# Altium PCB PCB.PcbDoc (part 1 of 2)
Units mil, origin at the board's own origin, x right, y up, seen from the top; angles counter-clockwise.
Board outline 3937.01 x 3937.01 mil, 4 copper layers (Top Layer, GND, POWER, Bottom Layer), stack 61.066 mil thick; 102 components, 56 nets, 281 pads, 1348 vias.
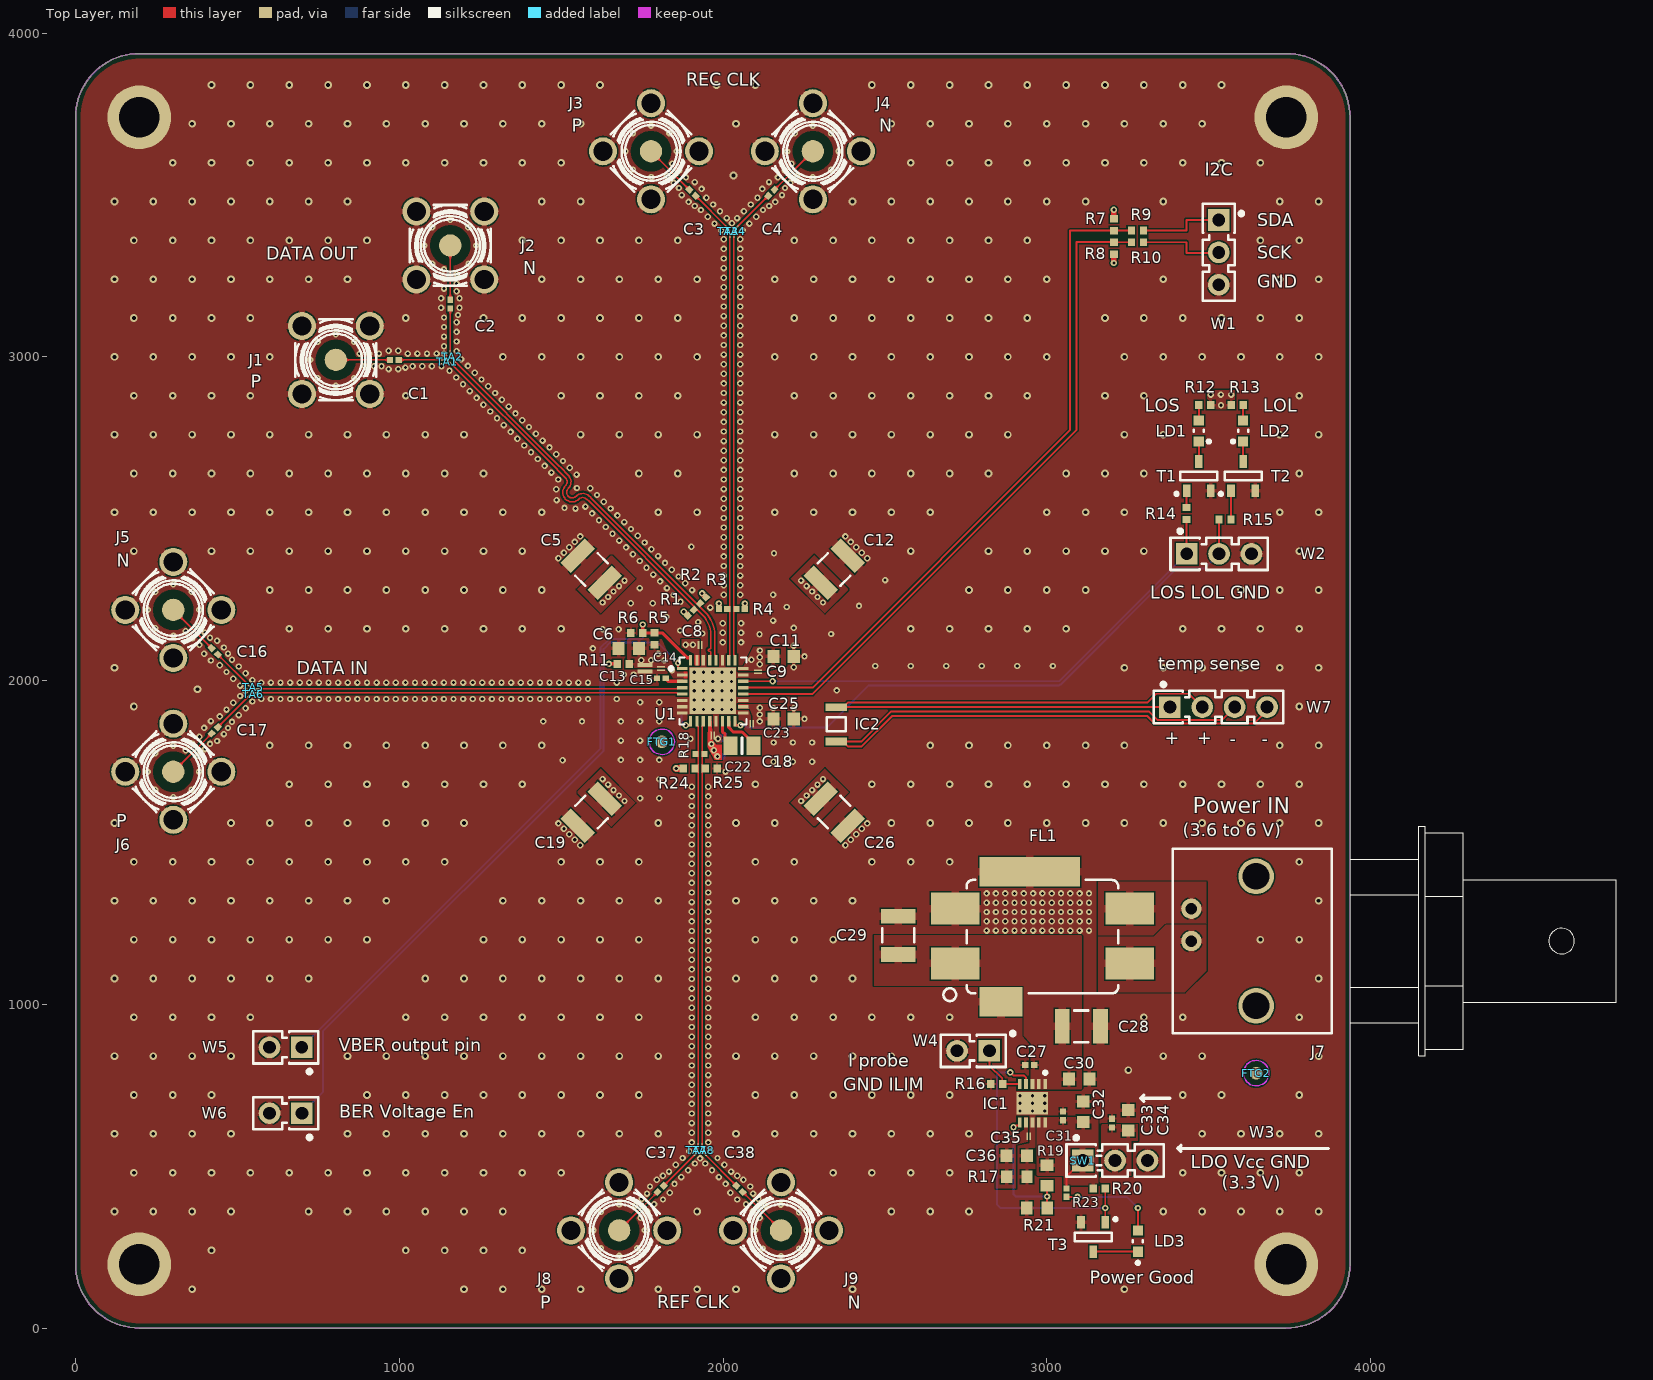
[diagram p0: Top Layer view]
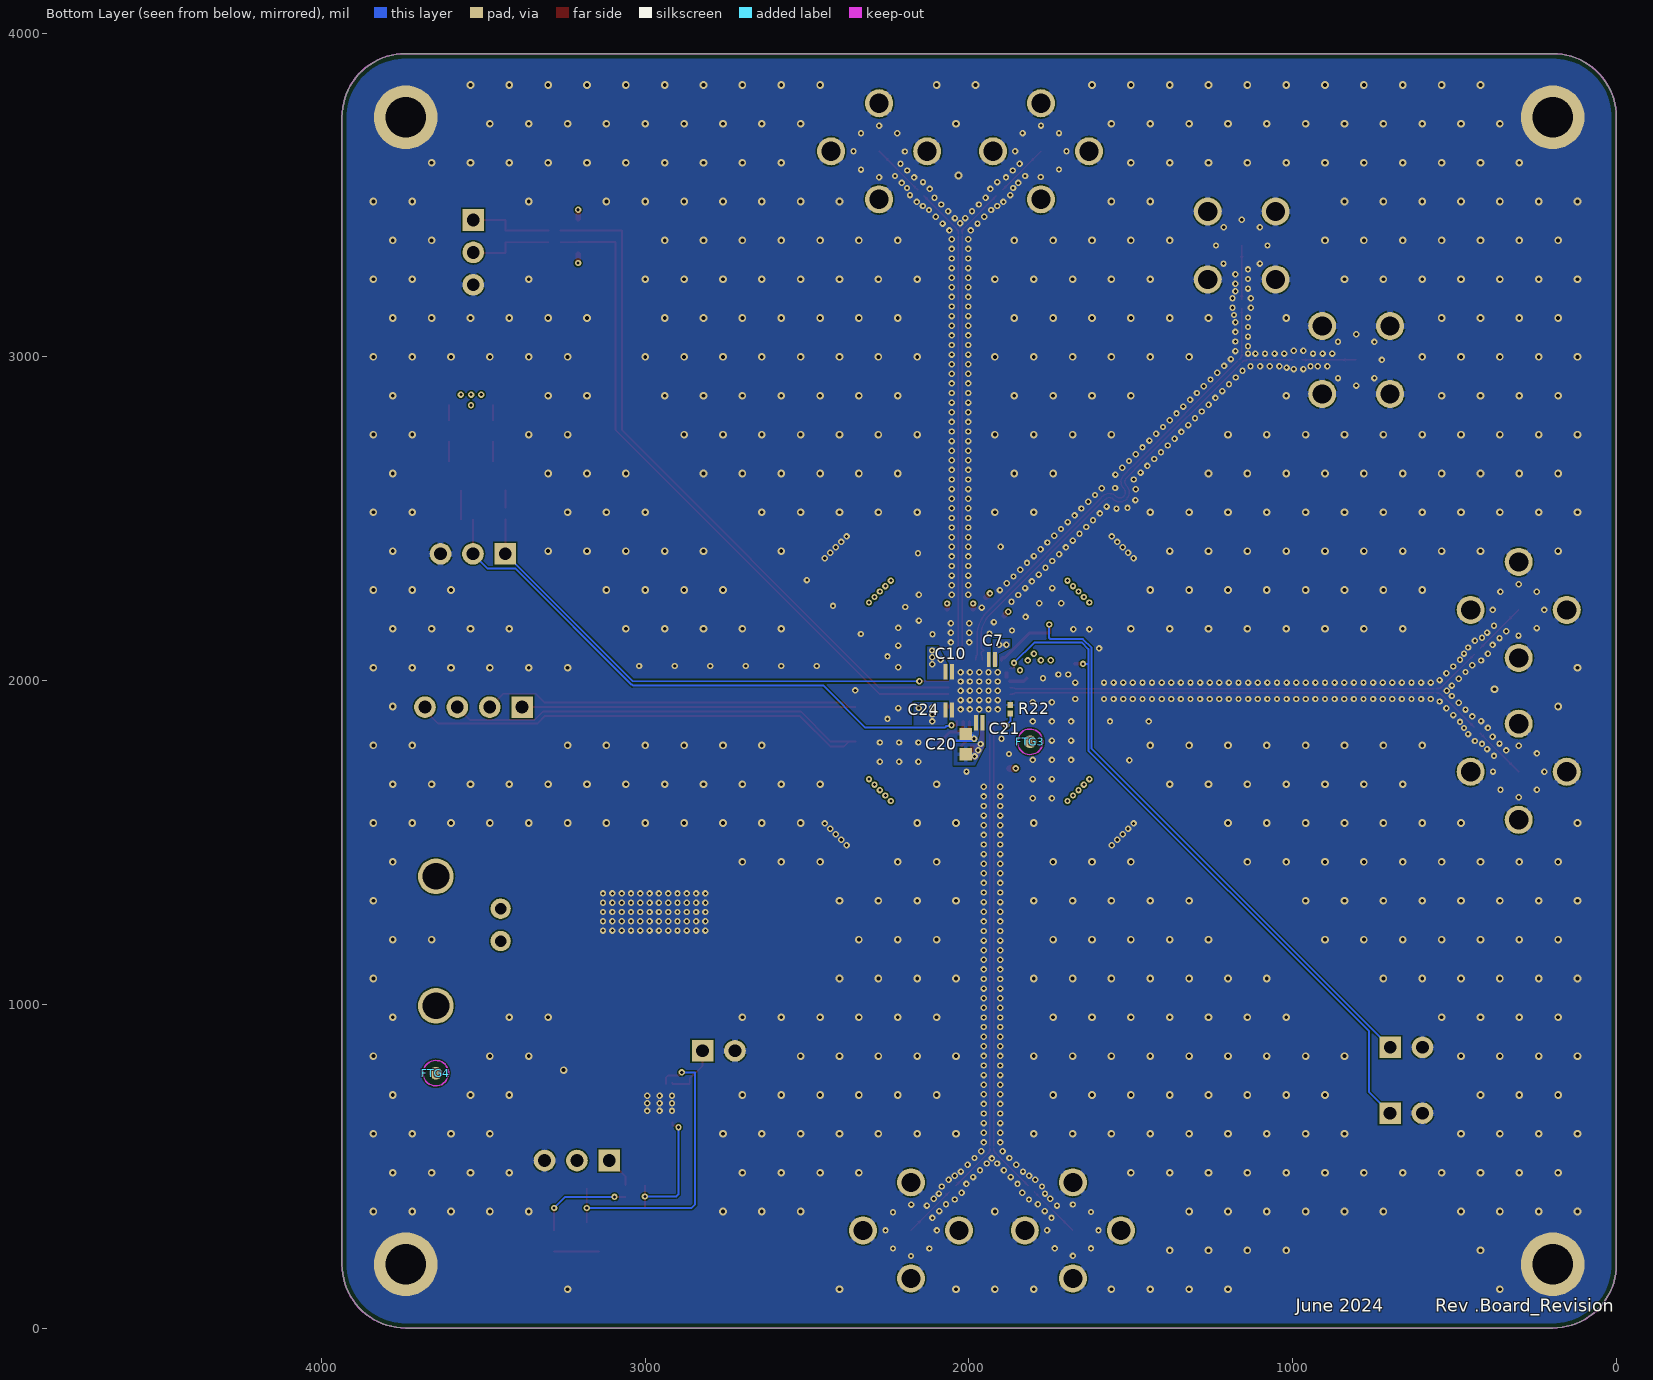
[diagram p1: Bottom Layer view, seen from below]
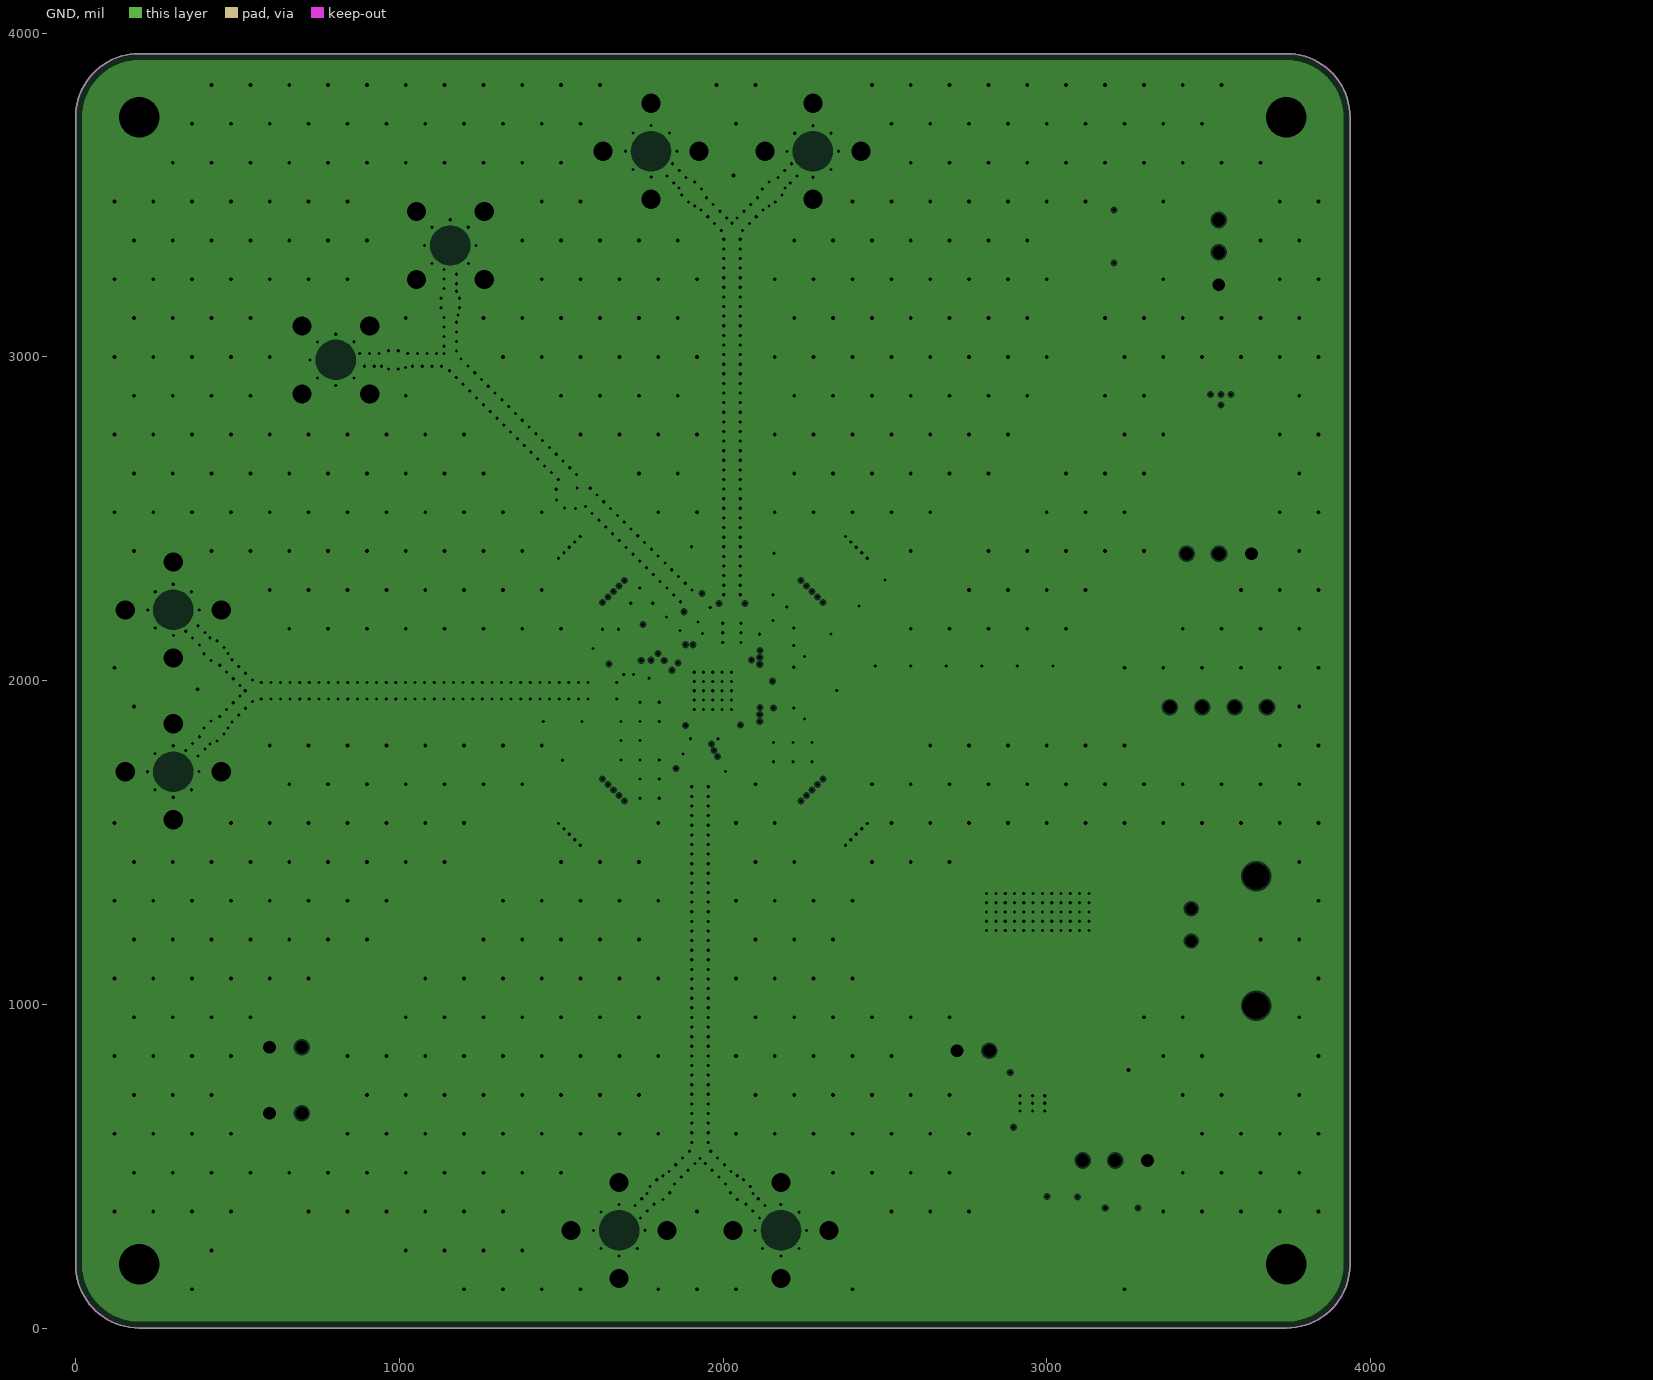
[diagram p2: GND, clearances drawn from the general rule]
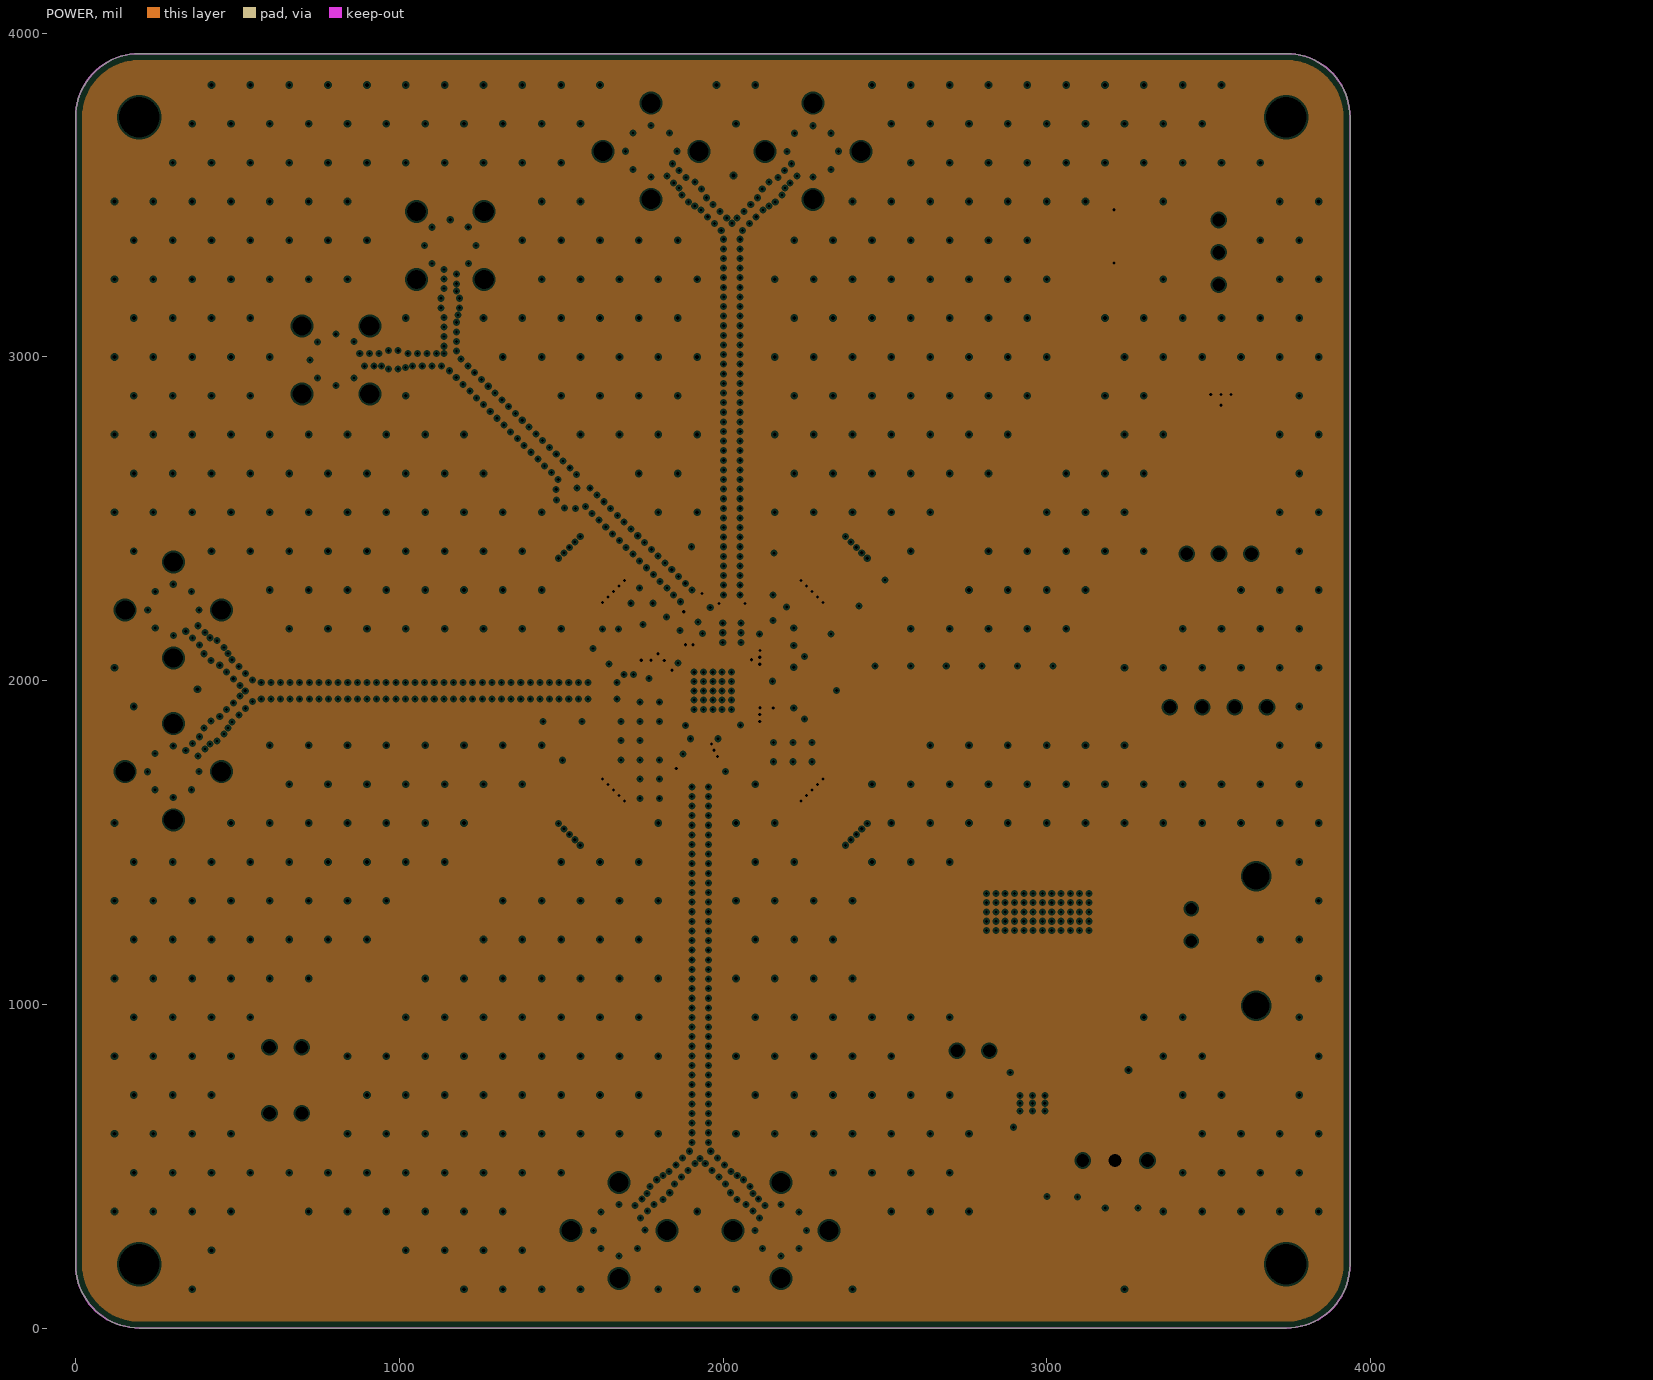
[diagram p3: POWER, clearances drawn from the general rule]
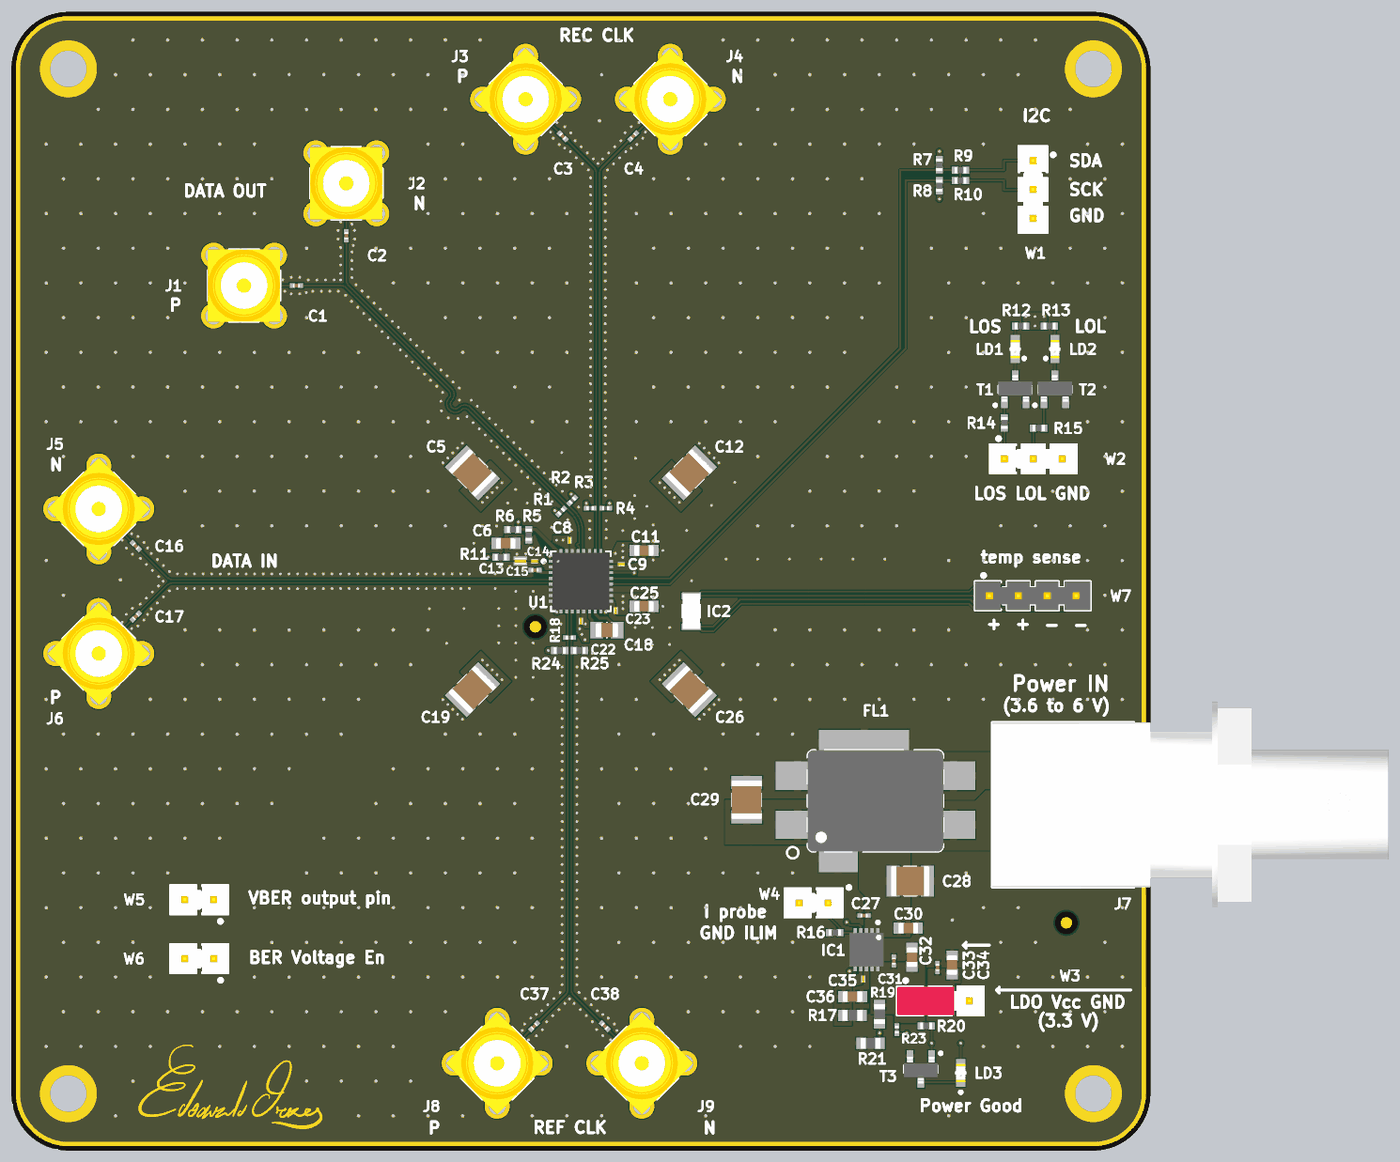
[diagram p5: 3D render of the assembled board from above, using the file's embedded part models]
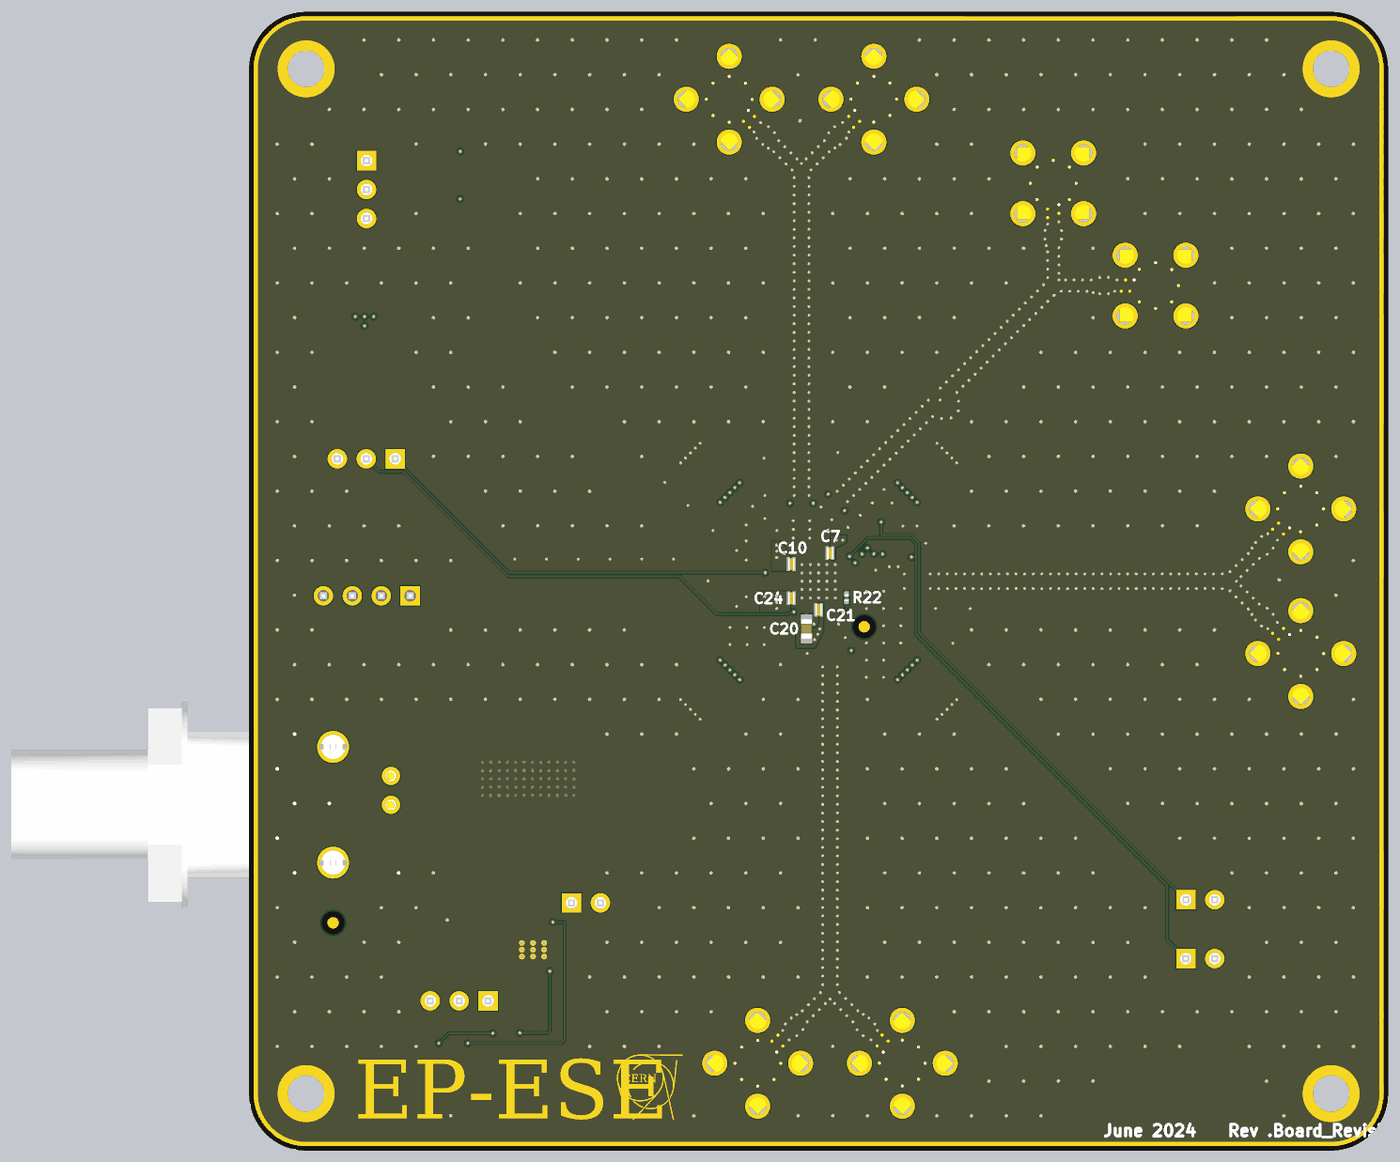
[diagram p6: 3D render of the assembled board from below, using the file's embedded part models]

## Layer stack, top to bottom
Top Solder: solder mask 1.969, Solder Resist, Dk 4.6
Top Layer: signal copper 1.772
Core_Top: core 3.937, R-5775G_1035, Dk 3.46
GND: plane copper 0.689, net GND
PrePreg_Top: prepreg 9.371, R-5670G, Dk 3.4
Core: core 29.528, R-5775G_2116, Dk 3.71
PrePreg_Bot: prepreg 9.371, R-5670G, Dk 3.4
POWER: plane copper 0.689, net Vcc
Core_Bottom: core 3.937, R-5775G_1035, Dk 3.46
Bottom Layer: signal copper 1.772
Bottom Solder: solder mask 1.969, Solder Resist, Dk 4.6

## Board outline
3937.01,3740.01 ccw(c3740.01,3740.01) 3740.01,3937.01 197,3937.01 ccw(c197,3740.01) 0,3740.01 0,197 ccw(c197,197) 197,0 3740.01,0 ccw(c3740.01,197) 3937.01,197 3937.01,787.4

## Design rules (kind name [scope] priority, off if disabled: settings)
BoardOutlineClearance BoardOutlineClearance_Silk_PWR_Connector [InComponentClass('PWR_Connector')] p1: gap=0 ignorepadtopadclearanceinfootprint=FALSE
BoardOutlineClearance [All] p2: gap=15 ignorepadtopadclearanceinfootprint=FALSE
Clearance Clearance_SMA_pad [HasFootprint('SAMTEC_SMA-J-P-H-ST-MT1') and InNetClass('50ohm')] p1: gap=4 ignorepadtopadclearanceinfootprint=FALSE except(27.6: SMDPad-Fill SMDPad-Poly SMDPad-Region)
Clearance Clearance_Coplanar [InAnyDifferentialPair or InNetClass('50ohm') or HasFootprint('lane_width_transition')] p2: gap=4 ignorepadtopadclearanceinfootprint=FALSE except(6: Arc-Fill Arc-Poly Arc-Region Track-Fill Track-Poly Track-Region Fill-Fill Fill-Poly Fill-Region Poly-Poly Poly-Region Region-Region)
Clearance [All] p3: gap=4 ignorepadtopadclearanceinfootprint=FALSE
ComponentClearance [All] p1: gap=-20 collisioncheckmode=3 verticalgap=0 showdistances=FALSE
DiffPairsRouting [InDifferentialPairClass('All Differential Pairs')] p1: maxlimit=8.23 minlimit=8.23 mostfreqgap=8.23 toplayer_minwidth=4 toplayer_maxwidth=5.18 toplayer_prefwidth=4 bottomlayer_minwidth=4 bottomlayer_maxwidth=5.18 bottomlayer_prefwidth=4 impedanceprofiledriven=TRUE impedanceprofileid={FCCFDEF1-A1CC-456B-AB0B-FF4024286867} impedanceprofilevalue=100.000000 maxuncoupledlength=200
HoleSize [All] p1: absolutevalues=TRUE maxlimit=255.91 minlimit=9.84 maxpercent=80.000 minpercent=20.000
HoleToHoleClearance [Isvia] p1: gap=11 allowstackedmicrovias=TRUE
HoleToHoleClearance HoleToHoleClearance_Standard [All] p2: gap=16 allowstackedmicrovias=TRUE
MatchedLengths MatchedLengths_Output_Lanes [InNetClass('Output_Lanes')] p1: tolerance=10 checknetsindiffpair=FALSE checkdiffpairvsdiffpair=TRUE checkxsignals=TRUE checkothers=TRUE
MatchedLengths MatchedLengths_Inside [InDifferentialPairClass('All Differential Pairs')] p2: tolerance=1 checknetsindiffpair=TRUE checkdiffpairvsdiffpair=FALSE checkxsignals=FALSE checkothers=FALSE
MinimumAnnularRing [not IsVia] p1: minimumring=6
MinimumSolderMaskSliver [All] p1: minsoldermaskwidth=2
PlaneClearance [All] p1: clearance=6
PlaneConnect PlaneConnect_Frame_Hole [InPadClass('Frame_Holes')] p1: planeconnectstyle=Direct reliefexpansion=20 reliefentries=4 reliefconductorwidth=10 reliefairgap=10
PlaneConnect PlaneConnect_PWR [InComponentClass('PWR_Jumper')] p2: planeconnectstyle=Relief reliefexpansion=20 reliefentries=4 reliefconductorwidth=25 reliefairgap=7
PlaneConnect [All] p3: pad.planeconnectstyle=Relief pad.reliefexpansion=20 pad.reliefentries=4 pad.reliefconductorwidth=12 pad.reliefairgap=7 via.planeconnectstyle=Direct via.reliefexpansion=20 via.reliefentries=4 via.reliefconductorwidth=10 via.reliefairgap=10
PolygonConnect PolygonConnect_Frame_Hole [InPadClass('Frame_Holes')] p1: connectstyle=Direct reliefconductorwidth=10 reliefentries=4 polygonreliefangle="90 Angle" airgapwidth=10
PolygonConnect PolygonConnect_Direct [(HasFootprint('CP_32_11_ADI') OR HasFootprint('LLL03TR61E333KE01') OR HasFootprint('SON50P300X300X80-11N-R175X248') OR HasFootprint('CAPC0510X04N'))] p2: connectstyle=Direct reliefconductorwidth=10 reliefentries=4 polygonreliefangle="90 Angle" airgapwidth=10 // LDO, CDR, some small capacitor
PolygonConnect PolygonConnect_Large [AsMM(PadXSize_AllLayers + PadYSize_AllLayers) > 2.5] p3: thpad.connectstyle=Relief thpad.reliefconductorwidth=20 thpad.reliefentries=4 thpad.polygonreliefangle="90 Angle" thpad.airgapwidth=4 smdpad.connectstyle=Relief smdpad.reliefconductorwidth=25 smdpad.reliefentries=4 smdpad.polygonreliefangle="90 Angle" smdpad.airgapwidth=4 via.connectstyle=Direct via.reliefconductorwidth=10 via.reliefentries=4 via.polygonreliefangle="90 Angle" via.airgapwidth=10
PolygonConnect "PolygonConnect_ Mid" [AsMM(PadXSize_AllLayers + PadYSize_AllLayers) > 1.5] p4: thpad.connectstyle=Relief thpad.reliefconductorwidth=12 thpad.reliefentries=4 thpad.polygonreliefangle="90 Angle" thpad.airgapwidth=4 smdpad.connectstyle=Relief smdpad.reliefconductorwidth=12 smdpad.reliefentries=4 smdpad.polygonreliefangle="90 Angle" smdpad.airgapwidth=4 via.connectstyle=Direct via.reliefconductorwidth=12 via.reliefentries=4 via.polygonreliefangle="90 Angle" via.airgapwidth=5
PolygonConnect [All] p5: thpad.connectstyle=Relief thpad.reliefconductorwidth=10 thpad.reliefentries=4 thpad.polygonreliefangle="90 Angle" thpad.airgapwidth=4 smdpad.connectstyle=Relief smdpad.reliefconductorwidth=8 smdpad.reliefentries=4 smdpad.polygonreliefangle="90 Angle" smdpad.airgapwidth=4 via.connectstyle=Direct via.reliefconductorwidth=10 via.reliefentries=4 via.polygonreliefangle="90 Angle" via.airgapwidth=10
RoutingVias [All] p1: holewidth=9.84 width=19.68 viastyle="Through Hole" minholewidth=9.84 minwidth=19.68 maxholewidth=11.81 maxwidth=23.62
SilkToSilkClearance [All] p1: silktosilkclearance=0
SilkToSolderMaskClearance [IsPad] p1: minsilkscreentomaskgap=3.5 clearancetoexposedcopper=TRUE
SolderMaskExpansion SolderMaskExpansion_Via [IsVia] p1: expansion=4 istentingtop=TRUE
SolderMaskExpansion [All] p2: expansion=0 istentingtop=FALSE
Width Width_lane_width_transition_arcs [HasFootprint('lane_width_transition')] p1: maxlimit=10 minlimit=1 preferedwidth=10 minimp=50.000000 maximp=50.000000 favimp=50.000000
Width Width_50ohm [InNetClass('50ohm')] p2: maxlimit=5.18 minlimit=5.18 preferedwidth=5.18 impedanceprofiledriven=TRUE impedanceprofileid={2039E037-1DE5-4FE9-8E1A-1FC9DE3EC960} impedanceprofilevalue=50.000000 minimp=50.000000 maximp=50.000000 favimp=50.000000
Width [All] p3: maxlimit=100 minlimit=5 preferedwidth=6 minimp=50.000000 maximp=50.000000 favimp=50.000000
21 further rules are at their usual default settings.

## Classes and differential pairs
net class 50ohm: NetC1_1 NetC1_2 NetC2_1 NetC2_2 NetC3_1 NetC3_2 NetC4_1 NetC4_2 NetC16_1 NetC16_2 NetC17_1 NetC17_2 NetC37_1 NetC37_2 NetC38_1 NetC38_2
component class PWR_Connector: J7
pad class Frame_Holes: Free-Frame_Holes
component class PWR_Jumper: W3
net class Output_Lanes: CLK_OUT_N CLK_OUT_P DATA_OUT_N DATA_OUT_P
net class Power: GND LDO_out NetFL1_1 NetFL1_3 Pmain Vcc
differential pair DATA_OUT: +DATA_OUT_P -DATA_OUT_N
differential pair DATA_IN: +DATA_IN_P -DATA_IN_N
differential pair CLK_OUT: +CLK_OUT_P -CLK_OUT_N
differential pair CLK_IN: +CLK_IN_P -CLK_IN_N

## Components (designator, comment, footprint, x,y, rotation, side; value= is the part's Value field where it differs from the comment)
C1 "100nF" CAPC0603X33N 985.08,2990.78 r180 top
C2 "100nF" CAPC0603X33N 1157.48,3163.18 r90 top
C3 "100nF" CAPC0603X33N 1905.65,3507.14 r135 top
C4 "100nF" CAPC0603X33N 2149.47,3507.14 r45 top
C5 "100uF" CAPC3225X270N 1593.58,2343.43 r315 top
C6 "10uF" CAPC1608X87N 1708.84,2099.58 r0 top
C7 "470nF" CAPC0510X04N 1929.13,2065.57 r180 bottom
C8 "33nF" LLL03TR61E333KE01 1929.13,2110.27 r180 top
C9 "33nF" LLL03TR61E333KE01 2107.99,2027.56 r90 top
C10 "470nF" CAPC0510X04N 2062.75,2027.77 r0 bottom
C11 "10uF" CAPC1608X87N 2186.92,2074.82 r180 top
C12 "100uF" CAPC3225X270N 2343.43,2343.43 r225 top
C13 "470nF" CAPC0510X04N 1759.13,2038.48 r90 top
C14 "33nF" LLL03TR61E333KE01 1808.39,2037.48 r90 top
C15 "100nF" CAPC0603X33N 1809.74,2007.16 r0 top
C16 "100nF" CAPC0603X33N 429.86,2090.41 r315 top locked
C17 "100nF" CAPC0603X33N 429.86,1846.6 r45 top locked
C18 "470nF" CAPC2013X140N 2058.61,1799.37 r0 top
C19 "100uF" CAPC3225X270N 1593.58,1593.58 r45 top
C20 "10uF" CAPC1608X87N 2010.37,1804.11 r270 bottom
C21 "470nF" CAPC0510X04N 1968.5,1870 r180 bottom
C22 "33nF" LLL03TR61E333KE01 1968.5,1830.36 r180 top
C23 "33nF" LLL03TR61E333KE01 2088.93,1866.93 r0 top
C24 "470nF" CAPC0510X04N 2062.75,1909.49 r0 bottom
C25 "10uF" CAPC1608X87N 2186.92,1881.74 r180 top
C26 "100uF" CAPC3225X270N 2343.43,1593.58 r135 top
C27 "220nF" CAPC0603X33N 2947.46,812.36 r0 top
C28 "100uF" CAPC3225X270N 3107.01,931.8 r180 top
C29 "100uF" CAPC3225X270N 2541.49,1212.93 r270 top
C30 "10uF" CAPC1608X87N 3100.31,769.1 r180 top
C31 "220nF" CAPC0603X33N 3050.21,655.15 r270 top
C32 "10uF" CAPC1608X87N 3113.16,668.52 r270 top
C33 "220nF" CAPC0603X33N 3201.35,633.17 r270 top
C34 "10uF" CAPC1608X87N 3251.74,641.63 r270 top
C35 "33nF" LLL03TR61E333KE01 2944.52,592.6 r180 top
C36 "10uF" CAPC1608X87N 2907.52,532.1 r180 top
C37 "100nF" CAPC0603X33N 1807.23,429.86 r45 top locked
C38 "100nF" CAPC0603X33N 2051.04,429.86 r135 top locked
FL1 "BNX029-01L" FIL_MURATA_BNX02 2986.69,1209.11 r180 top locked
FTG1 "Use only in PCB" FIDUCIAL_TOP_C100-200 1811.02,1811.02 r90 top
FTG2 "Use only in PCB" FIDUCIAL_TOP_C100-200 3646.85,787.4 r90 top
FTG3 "Use only in PCB" FIDUCIAL_TOP_C100-200 1811.02,1811.02 r90 bottom
FTG4 "Use only in PCB" FIDUCIAL_TOP_C100-200 3646.85,787.4 r90 bottom
IC1 "LT3045EDD" SON50P300X300X80-11N-R175X248 2955.8,694.39 r270 top
IC2 "PT1000 SMD 1206 fd F 0,3" DFN310X150X55-2N 2350,1865 r270 top
J1 "SMA" SAMTEC_SMA-J-P-H-ST-MT1#1 803.93,2990.78 r90 top
J2 "SMA" SAMTEC_SMA-J-P-H-ST-MT1#1 1157.48,3344.33 r90 top
J3 "SMA" SAMTEC_SMA-J-P-H-ST-MT1#1 1777.56,3635.24 r45 top locked
J4 "SMA" SAMTEC_SMA-J-P-H-ST-MT1#2 2277.56,3635.24 r315 top locked
J5 "SMA" SAMTEC_SMA-J-P-H-ST-MT1#2 301.77,2218.5 r315 top locked
J6 "SMA" SAMTEC_SMA-J-P-H-ST-MT1#2 301.77,1718.5 r45 top locked
J7 "BNC" AMPHENOL_B6252H7-NPP3G-50 3646.85,1195.5 r90 top locked
J8 "SMA" SAMTEC_SMA-J-P-H-ST-MT1#1 1679.13,301.77 r135 top locked
J9 "SMA" SAMTEC_SMA-J-P-H-ST-MT1#1 2179.13,301.77 r225 top locked
LD1 "APTD1608LSURCK" LED_KINGBRIGHT_KP-1608SURCK 3469.73,2771.29 r90 top locked
LD2 "APTD1608LSURCK" LED_KINGBRIGHT_KP-1608SURCK 3606.74,2771.29 r90 top locked
LD3 "APT1608VRCXF/A-5MAV" LED_KINGBRIGHT_KP-1608QBC-D 3281.53,268.41 r90 top
R1 "100" RESC0603X28N#1 1900.55,2209.58 r225 top
R2 "100" RESC0603X28N#1 1938.67,2247.71 r45 top
R3 "100" RESC0603X28N#1 2000.61,2221.28 r180 top
R4 "100" RESC0603X28N#1 2054.51,2221.29 r0 top
R5 "10k" RESC1005X40N 1787.86,2129.01 r270 top
R6 "3k" RESC1005X40N 1733.68,2146.93 r0 top
R7 "1k" RESC1005X40N 3207.56,3408.41 r90 top
R8 "1k" RESC1005X40N 3207.56,3336.12 r270 top
R9 "22" RESC1005X40N 3280.33,3389.94 r0 top
R10 "22" RESC1005X40N 3280.33,3354.26 r0 top
R11 "10k" RESC1005X40N 1691.8,2051.83 r0 top
R12 "787" RESC1005X40N 3488.23,2850.94 r0 top
R13 "787" RESC1005X40N 3588.23,2850.94 r180 top
R14 "200k" RESC1005X40N 3432.33,2516.21 r90 top
R15 "200k" RESC1005X40N 3550.83,2497.7 r0 top
R16 "300" RESC1005X40N 2846.13,753.44 r0 top
R17 "33k" RESC1608X55N 2907.52,467.61 r180 top
R18 "100" RESC0603X28N#2 1929.13,1773.39 r0 top
R19 "750k" RESC1608X55N 3001.19,471.52 r90 top
R20 "200k" RESC1005X40N 3162.21,431.09 r180 top
R21 "78k7" RESC1608X55N 2969.69,370.99 r0 top
R22 "100" RESC0603X28N#1 1872.33,1911.58 r270 bottom
R23 "100" RESC0603X28N#1 3060.74,418.1 r90 top
R24 "1M" RESC1005X40N 1895.09,1728.94 r180 top
R25 "1M" RESC1005X40N 1963.18,1728.94 r180 top
SW1 "Jumper Type1" STELVIO-KONTEK_3131730000402 3111.12,517.47 r0 top
T1 "BSH103" SOT95P230X110-3N 3469.73,2631.97 r90 top locked
T2 "BSH103" SOT95P230X110-3N 3606.74,2631.97 r90 top locked
T3 "BSH103" SOT95P230X110-3N 3143.31,281.21 r270 top
TA1 "Differential to Single Transition" lane_width_transition#1 1157.48,2990.78 r225 top net-tie
TA2 "Differential to Single Transition" lane_width_transition#2 1157.48,2990.78 r45 top net-tie
TA3 "Differential to Single Transition" lane_width_transition#1 2027.56,3385.24 r180 top net-tie
TA4 "Differential to Single Transition" lane_width_transition#2 2027.56,3385.24 r0 top net-tie
TA5 "Differential to Single Transition" lane_width_transition#2 551.77,1968.5 r90 top net-tie
TA6 "Differential to Single Transition" lane_width_transition#1 551.77,1968.5 r270 top net-tie
TA7 "Differential to Single Transition" lane_width_transition#2 1929.13,551.77 r180 top net-tie
TA8 "Differential to Single Transition" lane_width_transition#1 1929.13,551.77 r0 top net-tie
U1 "ADN2817ACPZ-RL7" CP_32_11_ADI 1968.5,1968.5 r0 top locked
W1 "Header 3" SAMTEC_HTSW-103-23-L-S 3531.36,3422.87 r270 top
W2 "Header 3" SAMTEC_HTSW-103-23-L-S 3432.33,2391.73 r0 top locked
W3 "Header 3" SAMTEC_HTSW-103-23-L-S 3111.12,517.47 r0 top
W4 "Header 2" SAMTEC_HTSW-102-23-L-S 2822.9,856.5 r180 top
W5 "Header 2" SAMTEC_HTSW-102-23-L-S 699,867.24 r180 top
W6 "Header 2" SAMTEC_HTSW-102-23-L-S 699.09,663.62 r180 top
W7 "Header 4" SAMTEC_HTSW-104-23-L-S 3380.51,1918.15 r0 top

## Footprints (in the part's own frame and the unit in brackets; to place one, negate y for a bottom-side part, rotate by r counter-clockwise, add the part's x,y. Pads: shape width x height; smd on the part's side, far side on the other; paste and mask are expansions set on the pad)
AMPHENOL_B6252H7-NPP3G-50 [mm] "RF / Coaxial Connector, BNC Coaxial, Right Angle Jack, Through Hole Right Angle, 50 ohm"
  round 1.6 hole 0.9: 1(0,5.08) 2(2.54,5.08)
  round 2.8 hole 2.1: MECH(-5.08,0) MECH_1(5.08,0)
  silkscreen extent -9,-28.27 9,6.53, body extent -9,-28.27 9,6.53, height 15.9
CAPC0510X04N [mm] "Chip Capacitor, 2-Leads, Body 0.52x1.00mm, IPC Medium Density"
  rect 0.3x1.2 smd: 1(-0.25,0) 2(0.25,0)
  body extent -0.29,-0.53 0.29,0.53, height 0.35
CAPC0603X33N [mm] "Chip Capacitor, Body 0.6x0.30mm, IPC Medium Density"
  rect 0.5x0.45 smd paste-0.025 mask-0.025: 1(-0.35,0) 2(0.35,0)
  body extent -0.31,-0.16 0.32,0.17, height 0.33
CAPC1608X87N [mm] "Chip Capacitor, Body 1.6x0.8mm IPC Medium Density"
  rect 0.95x1 smd: 1(-0.8,0) 2(0.8,0)
  body extent -0.87,-0.47 0.88,0.48, height 0.87
CAPC2013X140N [mm] "Capacitor, Non-Polarized, Chip; 2.00mm L X 1.25mm W X 1.40mm H, IPC Medium Density"
  rect 1.1x1.45 smd: 1(-0.9,0) 2(0.9,0)
  silkscreen extent 0,-0.63 0,0.63, body extent -1,-0.62 1.01,0.63, height 1.4
CAPC3225X270N [mm] "Chip Capacitor, Body 3.2x2.5mm, IPC Medium Density"
  rect 1.15x2.7 smd: 1(-1.5,0) 2(1.5,0)
  silkscreen extent -0.55,-1.25 0.55,1.25, body extent -1.7,-1.35 1.7,1.35, height 2.7
CP_32_11_ADI [mil]
  rect 32x10 smd paste+0 mask+0: 1(-94.5,68.9) 2(-94.5,49.21) 3(-94.5,29.53) 4(-94.5,9.84) 5(-94.5,-9.84) 6(-94.5,-29.53) 7(-94.5,-49.21) 8(-94.5,-68.9) 17(94.5,-68.9) 18(94.5,-49.21) 19(94.5,-29.53) 20(94.5,-9.84) 21(94.5,9.84) 22(94.5,29.53) 23(94.5,49.21) 24(94.5,68.9)
  rect 10x32 smd paste+0 mask+0: 9(-68.9,-94.5) 10(-49.21,-94.5) 11(-29.53,-94.5) 12(-9.84,-94.5) 13(9.84,-94.5) 14(29.53,-94.5) 15(49.21,-94.5) 16(68.9,-94.5) 25(68.9,94.5) 26(49.21,94.5) 27(29.53,94.5) 28(9.84,94.5) 29(-9.84,94.5) 30(-29.53,94.5) 31(-49.21,94.5) 32(-68.9,94.5)
  rect 144x144 smd paste-72 mask+0: 33(0,0)
  silkscreen extent -134,-104 104,104, body extent -99,-99 99,99, height 39
DFN310X150X55-2N [mm] "DFN; 2 Pin,3.10mm L X 1.50mm W X 0.40mm H, IPC Medium Density"
  rect 0.6x1.7 smd: 1(-1.35,0) 2(1.35,0)
  silkscreen extent -0.55,-0.75 0.55,0.75, body extent -1.55,-0.75 1.55,0.75, height 0.55
FIDUCIAL_TOP_C100-200 [mm] "Round Fiducial Target, Top Layer, 1.0mm, Top Solder 2.0mm, Keepout =2.0mm"
  round 1 smd paste-0.51 mask+0.5: FTG2(0,0)
  Top Layer keep-out circle w0.1: c0,0 r1
FIL_MURATA_BNX02 [mm] "Block Type EMIFIL LC Combined Type, BNX02* Series"
  rect 3.8x2.5 smd: 1(-6.85,2.1) 2(6.85,2.1) 3(-6.85,-2.2) 4_2(6.85,-2.2)
  rect 7.9x2.3 smd: 4(1,-5.1)
  rect 3.4x2.3 smd: 4_1(3.25,5.1)
  silkscreen extent -5.95,-4.45 7.77,5.05, body extent -6.05,-4.55 6.05,4.55, height 3.1
lane_width_transition#1 [mil]
  oval 4x15 smd paste-99999 mask+0: D(6.11,10.45)
  oval 14x5.18 smd rot 135 paste-99999 mask+0: S(15.27,-15.27)
  Top Layer region: 4.61,0.72 5.71,-5.81 8.97,-11.74 13.29,-10.34 10.63,-6.95 9.08,-3.38 7.86,0.45
  Top Layer lines w1: 10.74,-13.69 cw(c24.61,0.72) 4.61,0.72 ; 13.29,-10.34 cw(c27.61,3.63) 7.61,3.63
  Top Layer lines w4: 6.11,0.45 6.11,5.89
  Top Layer lines w5.18: 13.37,-13.37 11.74,-11.74
lane_width_transition#2 [mil]
  oval 4x15 smd paste-99999 mask+0: D(6.11,-10.45)
  oval 14x5.18 smd rot 45 paste-99999 mask+0: S(15.27,15.27)
  Top Layer region: 4.61,-0.72 5.71,5.81 8.97,11.74 13.29,10.34 10.63,6.95 9.08,3.38 7.86,-0.45
  Top Layer lines w1: 10.74,13.69 ccw(c24.61,-0.72) 4.61,-0.72 ; 13.29,10.34 ccw(c27.61,-3.63) 7.61,-3.63
  Top Layer lines w4: 6.11,-0.45 6.11,-5.89
  Top Layer lines w5.18: 11.74,11.74 13.37,13.37
LED_KINGBRIGHT_KP-1608QBC-D [mm] "SMT Blue LED, Case 0603, Body L 1.60mm x W 0.80mm x H 1.10mm"
  rect 0.8x0.8 smd: 1(-0.825,0) 2(0.825,0)
  silkscreen extent -1.82,-0.4 0.08,0.4, body extent -0.8,-0.4 0.8,0.4, height 1.1
LED_KINGBRIGHT_KP-1608SURCK [mm] "SMT Hyper Red LED, Case 0603, Body L 1.60mm x W 0.80mm x H 1.10mm"
  rect 0.8x0.8 smd: 1(-0.825,0) 2(0.825,0)
  silkscreen extent -0.95,-0.92 0.08,0.4, body extent -0.8,-0.4 0.8,0.4, height 1.1
LLL03TR61E333KE01 [mm] "Chip Capacitor, 2-Leads, Body 0.30x0.60mm, IPC High Density"
  rect 0.125x0.6 smd: 1(-0.126,0) 2(0.126,0)
  body extent -0.17,-0.32 0.17,0.32, height 0.2
RESC0603X28N#1 [mm] "Chip Resistor, EIA 0201, Metric 0603, Body 0.6 x 0.3mm, IPC Medium Density"
  rect 0.5x0.45 smd paste-0.025 mask-0.025: 1(-0.33,0) 2(0.33,0)
  body extent -0.32,-0.17 0.33,0.18, height 0.28
RESC0603X28N#2 [mm] "Chip Resistor, EIA 0201, Metric 0603, Body 0.6 x 0.3mm, IPC Medium Density"
  rect 0.476x0.45 smd paste-0.025 mask-0.025: 1(-0.342,0) 2(0.342,0)
  body extent -0.32,-0.17 0.33,0.18, height 0.28
RESC1005X40N [mm] "Chip Resistor, EIA 0402, Metric 1005, Body 1.0x0.5mm, IPC Medium Density"
  rect 0.58x0.62 smd: 1(-0.47,0) 2(0.47,0)
  body extent -0.52,-0.27 0.53,0.28, height 0.4
RESC1608X55N [mm] "Chip Resistor, EIA 0603, Metric 1608, Body 1.6x0.8mm, IPC Medium Density"
  rect 0.9x1 smd: 1(-0.8,0) 2(0.8,0)
  body extent -0.87,-0.47 0.88,0.48, height 0.55
SAMTEC_HTSW-102-23-L-S [mm] "2 Contacts - Pitch 2.54mm - Single Row  Through Mount Straigh Header (Post Lead 5.84mm, Tail Lead 2.92mm, Insulator 2.54mm)"
  rect 1.7x1.7 hole 1: 1(0,0)
  round 1.7 hole 1: 2(2.54,0)
  silkscreen extent -1.98,-1.51 3.81,1.27, body extent -1.27,-1.27 3.81,1.27, height 8.38
SAMTEC_HTSW-103-23-L-S [mm] "3 Contacts - Pitch 2.54mm - Single Row  Through Mount Straigh Header (Post Lead 5.84mm, Tail Lead 2.92mm, Insulator 2.54mm)"
  rect 1.7x1.7 hole 1: 1(0,0)
  round 1.7 hole 1: 2(2.54,0) 3(5.08,0)
  silkscreen extent -1.27,-1.27 6.35,1.93, body extent -1.27,-1.27 6.35,1.27, height 8.38
SAMTEC_HTSW-104-23-L-S [mm] "4 Contacts - Pitch 2.54mm - Single Row Through Mount Straigh Header (Post Lead 5.84mm, Tail Lead 2.92mm, Insulator 2.54mm)"
  rect 1.7x1.7 hole 1: 1(0,0)
  round 1.7 hole 1: 2(2.54,0) 3(5.08,0) 4(7.62,0)
  silkscreen extent -1.27,-1.27 8.89,1.93, body extent -1.27,-1.27 8.89,1.27, height 8.38
SAMTEC_SMA-J-P-H-ST-MT1#1 [mm] "50 Ohms SMA Straight Mixed Technology PCB Jack"
  round 1.75 smd: 1(0,0)
  round 2.2 hole 1.5: 2(-2.665,2.665) 2_1(-2.665,-2.665) 2_2(2.665,2.665) 2_3(2.665,-2.665)
  silkscreen extent -3.17,-3.17 3.17,3.17, body extent -3.17,-3.17 3.18,3.18, height 7.95
SAMTEC_SMA-J-P-H-ST-MT1#2 [mm] "50 Ohms SMA Straight Mixed Technology PCB Jack"
  round 1.75 smd: 1(0,0)
  round 2.2 hole 1.5: 2(2.665,-2.665) 2_1(2.665,2.665) 2_2(-2.665,-2.665) 2_3(-2.665,2.665)
  silkscreen extent -3.18,-3.18 3.18,3.18, body extent -3.17,-3.17 3.18,3.18, height 7.95
SON50P300X300X80-11N-R175X248 [mm] "SON, 0.50mm Pitch; 10-pin, 3.00mm W  X 3.00mm L X 0.80mm H Body, (w/thermal tab 1.75 X 2.48 mm), IPC Medium Density"
  rect 0.8x0.3 smd: 1(-1.5,1) 2(-1.5,0.5) 3(-1.5,0) 4(-1.5,-0.5) 5(-1.5,-1) 6(1.5,-1) 7(1.5,-0.5) 8(1.5,0) 9(1.5,0.5) 10(1.5,1)
  rect 1.75x2.48 smd: 11(0,0)
  silkscreen extent -2.52,0.88 -2.28,1.13, body extent -1.5,-1.5 1.5,1.5, height 0.8
SOT95P230X110-3N [mm] "SOT23, 3 pin, Pitch 0.95mm - 1.3mm W X 2.9mm L X 1.1mm H, IPC Medium Density"
  rect 1x0.6 smd: 1(-1.15,0.95) 2(-1.15,-0.95) 3(1.15,0)
  silkscreen extent -1.52,-1.45 0.33,1.87, body extent -1.08,-1.5 1.25,1.5, height 1.1
STELVIO-KONTEK_3131730000402 [mm] "Red Insulated Jumper Pitch 2.54mm W=2.5mm L=5mm H=6.5mm"
  round 0.9 smd paste-0.46 mask-0.46: 1(0,0)
  silkscreen extent 1.1,-0.38 1.44,0.38, body extent -1.23,-1.25 3.77,1.25, height 9.29

## Part data
C1 C2 C3 C4 C15 C16 C17 C37 C38: library part CC0201_100NF_6.3V_10%_X7R, "Non-polarised capacitor", Case=0201, Manufacturer=GENERIC, Manufacturer1 ComponentHeight=0.33mm, Manufacturer1 Example="YAGEO PHYCOMP", Manufacturer1 Part Number=CC0201KRX7R5BB104, Tolerance=±10%, Voltage=6.3V, Author="CERN DEM BC", Component Type=Standard, CreateDate=11/20/2020, HelpURL=\\cern.ch\dfs\Applications\Altium\Datasheets\CC0201_X7R_YAGEO_6.3VTO50V.pdf, LatestRevisionDate=11/20/2020, Manufacturer Part Number=CC0201_100NF_6.3V_10%_X7R, Mounted=Yes, Part Description="SMD Multilayer Chip Ceramic Capacitor", Part Number=CC0201_100NF_6.3V_10%_X7R, Pin Count=2, Sense=No, SMD=Yes, Socket=No, Status="Not Recommended", TC=X7R
C5 C12 C19 C26 C28 C29: library part CC1210_100UF_6.3V_20%_X7U, "GRM32EC70J107ME15", Case=1210, Manufacturer=GENERIC, Manufacturer1 ComponentHeight=2.7mm, Manufacturer1 Example=MURATA, Manufacturer1 Part Number=GRM32EE70J107ME15L, Tolerance=±20%, Voltage=6.3V, Author="CERN DEM MR", Component Type=Standard, HelpURL=\\cern.ch\dfs\Applications\Altium\Datasheets\CC1210_X7U_MURATA.pdf, Manufacturer Part Number=CC1210_100UF_6.3V_20%_X7U, Mounted=Yes, Part Description="SMD Multilayer Chip Ceramic Capacitor", Part Number=CC1210_100UF_6.3V_20%_X7U, Pin Count=2, Sense=No, SMD=Yes, Socket=No, Status=None, TC=X7U
  C5 C12 C19 C26: CreateDate=10/12/2017, LatestRevisionDate=10/12/2017
  C28 C29: CreateDate=12/10/2017, LatestRevisionDate=12/10/2017
C6 C11 C20 C25 C30 C32 C34 C36: library part CC0603_10UF_6.3V_20%_X5R, "GRM188D71A106KA73", Case=0603, Manufacturer=GENERIC, Manufacturer1 ComponentHeight=0.95mm, Manufacturer1 Example=KEMET, Manufacturer1 Part Number=C0603C106M9PAC, Manufacturer Part Number=CC0603_10uF_6.3V_20%_X5R, Tolerance=±20%, Voltage=6.3V, Author="CERN DEM JLC", Component Type=Standard, CreateDate=03/12/2007, HelpURL=\\cern.ch\dfs\Applications\Altium\Datasheets\CC0603_X5R_KEMET.pdf, LatestRevisionDate=03/12/2007, Mounted=Yes, Part Description="SMD Multilayer Chip Ceramic Capacitor", Part Number=CC0603_10UF_6.3V_20%_X5R, Pin Count=2, Sense=No, SMD=Yes, Socket=No, Status=Preferred, TC=X5R
C7 C10 C13 C21 C24: library part "Capacitor - non polarized", "LLL153C70G474ME17"
C8 C9 C14 C22 C23 C35: library part "Capacitor - non polarized", "LLL03TR61E333KE01"
C18: library part CC0805_470NF_50V_10%_X7R_MURATA_GCM21BR71H474KA55L, "GCM21BR71H474KA55L", Case=0805, Manufacturer=MURATA, Tolerance=±10%, Voltage=50V, Author="CERN DEM JLC", Component Type=Standard, ComponentHeight=1.4mm, CreateDate=5/10/2017, HelpURL=\\cern.ch\dfs\Applications\Altium\Datasheets\CC0805_MURATA_GCM21BR71H474KA55L.pdf, LatestRevisionDate=5/10/2017, Manufacturer Part Number=GCM21BR71H474KA55L, Mounted=Yes, Part Description="SMD Chip Monolithic Ceramic Capacitor for Automotive", Part Number=CC0805_470NF_50V_10%_X7R_MURATA_GCM21BR71H474KA55L, Pin Count=2, Sense=No, SMD=Yes, Socket=No, Status="Not Recommended", TC=X7R
C27 C31 C33: library part CC0201_220NF_6.3V_10%_X7S_TDK_C0603X7S0J224K030, "GRM033C80J224KE90D", Case=0201, Manufacturer=TDK, Manufacturer Part Number=C0603X7S0J224K030, Tolerance=±10%, Voltage=6.3V, Author="CERN DEM BC", Component Type=Standard, ComponentHeight=0.33mm, CreateDate=11/25/2020, HelpURL=\\cern.ch\dfs\Applications\Altium\Datasheets\CC0201_X7S_TDK_C.pdf, LatestRevisionDate=11/25/2020, Mounted=Yes, Part Description="SMD Multilayer Chip Ceramic Capacitor", Part Number=CC0201_220NF_6.3V_10%_X7S_TDK_C0603X7S0J224K030, Pin Count=2, Sense=No, SMD=Yes, Socket=No, Status="Not Recommended", TC=X7S
FL1: library part FIL_MURATA_BNX022-01L, "Block Type EMIFIL (LC Combined)", Manufacturer=MURATA, Manufacturer Part Number=BNX022-01L, Resistance=0.5R, Author="CERN DEM JLC", Component Type=Standard, ComponentHeight=3.3mm, CreateDate=10/10/2012, HelpURL=\\cern.ch\dfs\Applications\Altium\Datasheets\FIL_MURATA_BNX022-01L.pdf, LatestRevisionDate=10/10/2012, Mounted=Yes, Part Description="Block Type EMIFIL (LC Combined) SMD Type, BNX02* Series", Part Number=FIL_MURATA_BNX022-01L, Pin Count=2, Sense=No, SMD=Yes, Socket=No
FTG1 FTG2 FTG3 FTG4: library part FIDUCIAL_TARGET_C100-200, "Fiducial Target", Author="CERN DEM JLC", Component Type="Standard (No BOM)", ComponentHeight=0mm, CreateDate=09/02/2010, Family=Fiducial, HelpURL=Undefined, LatestRevisionDate=04/04/2012, Mounted=No, PackageDescription="Round Fiducial Target, Top Layer, 1.0mm, Top Solder 2.0mm, Keepout =2.0mm", Part Description="Round Fiducial Target, Top Layer, 1.0mm, Top Solder 2.0mm, Keepout =2.0mm", Part Number=FIDUCIAL_TARGET_C100-200, Pin Count=1, Sense=No, SMD=Yes, Socket=No, Status=None
IC1: library part LT3045EDD#PBF, "20V, 500mA, Ultralow Noise, Ultrahigh PSRR Linear Regulator", Case=SON10, Manufacturer="LINEAR TECHNOLOGY", Author="CERN DEM JLC", Bonding=No, Component Type=Standard, ComponentHeight=0.8mm, CreateDate=07/12/2016, Device=LT3045EDD, HelpURL=\\cern.ch\dfs\Applications\Altium\Datasheets\LT3045EDD#PBF.pdf, LatestRevisionDate=03/02/2022, Manufacturer Part Number=LT3045EDD, Mounted=Yes, PackageDescription="SON, 0.50mm Pitch; 10 Pin, 3.00mm W X 3.00mm L X 0.80mm H body (w/Thermal Tab 1.75 X 2.48 mm), IPC Medium Density", Part Description="20V, 500mA, Ultralow Noise, Ultrahigh PSRR Linear Regulator", Part Number=LT3045EDD#PBF, Pin Count=11, PressFit=No, Sense=No, SMD=Yes, Socket=No
IC2: "2 Pin Temperature Sensor", Case=DFN2, Manufacturer="UMWELTSENSORTECHNIK GmbH (UST)", Author="CERN DEM JLC", Bonding=No, Component Type=Standard, ComponentHeight=0.55mm, CreateDate=8/20/2018, Device="PT1000 SMD 1206 fd F 0,3", HelpURL="\\cern.ch\dfs\Applications\Altium\Datasheets\PT1000 SMD 1206 fd.pdf", LatestRevisionDate=8/22/2018, Manufacturer Part Number="PT1000 SMD 1206 fd F 0,3", Mounted=Yes, PackageDescription="DFN; 2 Pin,3.10mm L X 1.50mm W X 0.40mm H, IPC Medium Density", Part Description="-50°C to +150°C, 1000 Ohm at 0°C Platinum Temperature Sensor", Part Number="PT1000 SMD 1206 fd F 0,3", Pin Count=2, PressFit=No, Sense=No, SMD=Yes, Socket=No
J1 J2 J3 J4 J5 J6 J8 J9: library part SAMTEC_SMA-J-P-H-ST-MT1, Manufacturer=SAMTEC, Manufacturer Part Number=SMA-J-P-H-ST-MT1, Author="CERN DEM HF", Component Type=Standard, ComponentHeight=7.95mm, CreateDate=5/24/2023, Family=SMA, HelpURL=\\cern.ch\dfs\Applications\Altium\Datasheets\SAMTEC_SMA-J-P-H-ST-MT1.pdf, LatestRevisionDate=5/24/2023, Mounted=Yes, Part Description="50 Ohms SMA Straight Mixed Technology PCB Jack", Part Number=SAMTEC_SMA-J-P-H-ST-MT1, Pin Count=5, PressFit=No, Sense=Yes, Sense Comment="assembly limitations", SMD=Yes, Socket=No, Status="Not Recommended"
J7: library part AMPHENOL_B6252H7-NPP3G-50, "AMPHENOL_B6252H7-NPP3G-50", Manufacturer=AMPHENOL-RF, Manufacturer Part Number=B6252H7-NPP3G-50, Author="CERN DEM HF", Component Type=Standard, ComponentHeight=13.4mm, CreateDate=13/02/2023, Family=BNC, HelpURL=\\cern.ch\dfs\Applications\Altium\Datasheets\AMPHENOL-RF_B6252H7-NPP3G-50.pdf, LatestRevisionDate=13/02/2023, Mounted=Yes, Part Description="RF / Coaxial Connector, BNC Coaxial, Right Angle Jack, Through Hole Right Angle, 50 ohm", Part Number=AMPHENOL_B6252H7-NPP3G-50, Pin Count=4, PressFit=No, Sense=No, SMD=No, Socket=No, Status=None
LD1 LD2: library part LED_KINGBRIGHT_KP-1608SURCK, "LED Red 1C 2A", Case=0603, Color=Red, Manufacturer=KINGBRIGHT, Manufacturer Part Number=KP-1608SURCK, Author="CERN DEM HF", Bonding=No, Component Type=Standard, ComponentHeight=1.1mm, CreateDate=10/1/2021, HelpURL=\\cern.ch\dfs\Applications\Altium\Datasheets\LED_KINGBRIGHT_KP-1608SURCK.pdf, LatestRevisionDate=10/1/2021, Mounted=Yes, PackageDescription="SMT Hyper Red LED, Case 0603, Body L 1.60mm x W 0.80mm x H 1.10mm", Part Description="1.6x0.8mm SMD Chip Hyper Red LED Lamp", Part Number=LED_KINGBRIGHT_KP-1608SURCK, Pin Count=2, PressFit=No, Sense=No, SMD=Yes, Socket=No
LD3: library part LED_KINGBRIGHT_KP-1608QBC-D, "LED Blue 1C 2A", Case=0603, Color=Blue, Manufacturer=KINGBRIGHT, Manufacturer Part Number=KP-1608QBC-D, Author="CERN DEM HF", Bonding=No, Component Type=Standard, ComponentHeight=1.1mm, CreateDate=10/1/2021, HelpURL=\\cern.ch\dfs\Applications\Altium\Datasheets\LED_KINGBRIGHT_KP-1608QBC-D.pdf, LatestRevisionDate=10/1/2021, Mounted=Yes, PackageDescription="SMT Blue LED, Case 0603, Body L 1.60mm x W 0.80mm x H 1.10mm", Part Description="1.6x0.8mm SMD Chip Blue LED Lamp", Part Number=LED_KINGBRIGHT_KP-1608QBC-D, Pin Count=2, PressFit=No, Sense=No, SMD=Yes, Socket=No
R1 R2 R3 R4 R18 R22 R23: library part R0201_100R_1%_0.05W_200PPM, "Resistor - 1%", Case=0201, Manufacturer=GENERIC, Manufacturer1 ComponentHeight=0.27mm, Manufacturer1 Example=VISHAY, Manufacturer1 Part Number=CRCW0201100RFNED, Power=0.05W, Tolerance=±1%, Author="CERN DEM JLC", Component Type=Standard, CreateDate=11/13/2014, HelpURL="\\cern.ch\dfs\Applications\Altium\Datasheets\R0201_VISHAY_CRCW e3.pdf", LatestRevisionDate=11/13/2014, Manufacturer Part Number=R0201_100R_1%_0.05W_200PPM, Mounted=Yes, Part Description="Thick Film Chip Resistor", Part Number=R0201_100R_1%_0.05W_200PPM, Pin Count=2, PressFit=No, Sense=No, SMD=Yes, Socket=No, Status="Not Recommended", TC=±200ppm/°C
R5 R11: library part R0402_10K_1%_0.0625W_100PPM, "Resistor - 1%", Case=0402, Manufacturer=GENERIC, Manufacturer1 ComponentHeight=0.4mm, Manufacturer1 Example="YAGEO PHYCOMP", Manufacturer1 Part Number=232270671003L, Power=0.0625W, Tolerance=±1%, Author="CERN DEM JLC", Component Type=Standard, CreateDate=12/3/2007, HelpURL=\\cern.ch\dfs\Applications\Altium\Datasheets\R0402_Phycomp_RC0402.pdf, LatestRevisionDate=10/17/2012, Manufacturer Part Number=R0402_10K_1%_0.0625W_100PPM, Part Description="General Purpose Thick Film Chip Resistor", Part Number=R0402_10K_1%_0.0625W_100PPM, Pin Count=2, PressFit=No, Sense=No, SMD=Yes, Socket=No, Status="Not Recommended", TC=±100ppm/°C
  R5: Mounted=No
  R11: Mounted=Yes
R6: library part R0402_3K_1%_0.0625W_100PPM, "Resistor - 1%", Case=0402, Manufacturer=GENERIC, Manufacturer1 ComponentHeight=0.4mm, Manufacturer1 Example="YAGEO PHYCOMP", Manufacturer1 Part Number=232270673002L, Power=0.0625W, Tolerance=±1%, Author="CERN DEM JLC", Component Type=Standard, CreateDate=12/3/2007, HelpURL=\\cern.ch\dfs\Applications\Altium\Datasheets\R0402_Phycomp_RC0402.pdf, LatestRevisionDate=10/17/2012, Manufacturer Part Number=R0402_3K_1%_0.0625W_100PPM, Mounted=Yes, Part Description="General Purpose Thick Film Chip Resistor", Part Number=R0402_3K_1%_0.0625W_100PPM, Pin Count=2, PressFit=No, Sense=No, SMD=Yes, Socket=No, Status="Not Recommended", TC=±100ppm/°C
R7 R8: library part R0402_1K_1%_0.0625W_100PPM, "Resistor - 1%", Case=0402, Manufacturer=GENERIC, Manufacturer1 ComponentHeight=0.4mm, Manufacturer1 Example="YAGEO PHYCOMP", Manufacturer1 Part Number=232270671002L, Power=0.0625W, Tolerance=±1%, Author="CERN DEM JLC", Component Type=Standard, CreateDate=12/3/2007, HelpURL=\\cern.ch\dfs\Applications\Altium\Datasheets\R0402_Phycomp_RC0402.pdf, LatestRevisionDate=10/17/2012, Manufacturer Part Number=R0402_1K_1%_0.0625W_100PPM, Mounted=Yes, Part Description="General Purpose Thick Film Chip Resistor", Part Number=R0402_1K_1%_0.0625W_100PPM, Pin Count=2, PressFit=No, Sense=No, SMD=Yes, Socket=No, Status="Not Recommended", TC=±100ppm/°C
R9 R10: library part R0402_22R_1%_0.0625W_100PPM, "Resistor - 1%", Case=0402, Manufacturer=GENERIC, Manufacturer1 ComponentHeight=0.4mm, Manufacturer1 Example="YAGEO PHYCOMP", Manufacturer1 Part Number=232270672209L, Power=0.0625W, Tolerance=±1%, Author="CERN DEM JLC", Component Type=Standard, CreateDate=12/3/2007, HelpURL=\\cern.ch\dfs\Applications\Altium\Datasheets\R0402_Phycomp_RC0402.pdf, LatestRevisionDate=10/17/2012, Manufacturer Part Number=R0402_22R_1%_0.0625W_100PPM, Mounted=Yes, Part Description="General Purpose Thick Film Chip Resistor", Part Number=R0402_22R_1%_0.0625W_100PPM, Pin Count=2, PressFit=No, Sense=No, SMD=Yes, Socket=No, Status="Not Recommended", TC=±100ppm/°C
R12 R13: library part R0402_787R_1%_0.1W_100PPM, "Resistor - 1%", Case=0402, Manufacturer=GENERIC, Manufacturer1 ComponentHeight=0.4mm, Manufacturer1 Example=PANASONIC, Manufacturer1 Part Number=ERJ2RKF7870X, Power=0.1W, Tolerance=±1%, Voltage=50V, Author="CERN DEM BC", Component Type=Standard, CreateDate=9/14/2020, HelpURL=\\cern.ch\dfs\Applications\Altium\Datasheets\R0402_PANASONIC_ERJ2RK.pdf, LatestRevisionDate=9/14/2020, Manufacturer Part Number=R0402_787R_1%_0.1W_100PPM, Mounted=Yes, Part Description="General Purpose Thick Film Chip Resistor", Part Number=R0402_787R_1%_0.1W_100PPM, Pin Count=2, PressFit=No, Sense=No, SMD=Yes, Socket=No, Status="Not Recommended", TC=±100ppm/°C
R14 R15 R20: library part R0402_200K_1%_0.0625W_100PPM, "Resistor - 1%", Case=0402, Manufacturer=GENERIC, Manufacturer1 ComponentHeight=0.4mm, Manufacturer1 Example="YAGEO PHYCOMP", Manufacturer1 Part Number=232270672004L, Power=0.0625W, Tolerance=±1%, Author="CERN DEM JLC", Component Type=Standard, CreateDate=12/3/2007, HelpURL=\\cern.ch\dfs\Applications\Altium\Datasheets\R0402_Phycomp_RC0402.pdf, LatestRevisionDate=10/17/2012, Manufacturer Part Number=R0402_200K_1%_0.0625W_100PPM, Mounted=Yes, Part Description="General Purpose Thick Film Chip Resistor", Part Number=R0402_200K_1%_0.0625W_100PPM, Pin Count=2, PressFit=No, Sense=No, SMD=Yes, Socket=No, Status="Not Recommended", TC=±100ppm/°C
R16: library part R0402_300R_1%_0.0625W_100PPM, "Resistor - 1%", Case=0402, Manufacturer=GENERIC, Manufacturer1 ComponentHeight=0.4mm, Manufacturer1 Example="YAGEO PHYCOMP", Manufacturer1 Part Number=232270673001L, Power=0.0625W, Tolerance=±1%, Author="CERN DEM JLC", Component Type=Standard, CreateDate=03/12/2007, HelpURL=\\cern.ch\dfs\Applications\Altium\Datasheets\R0402_Phycomp_RC0402.pdf, LatestRevisionDate=17/10/2012, Manufacturer Part Number=R0402_300R_1%_0.0625W_100PPM, Mounted=Yes, Part Description="General Purpose Thick Film Chip Resistor", Part Number=R0402_300R_1%_0.0625W_100PPM, Pin Count=2, PressFit=No, Sense=No, SMD=Yes, Socket=No, Status="Not Recommended", TC=±100ppm/°C
R17: library part R0603_33K_1%_0.1W_100PPM, "Resistor - 1%", Case=0603, Manufacturer=GENERIC, Manufacturer1 ComponentHeight=0.55mm, Manufacturer1 Example="NIC COMPONENT", Manufacturer1 Part Number=NRC06F3302TRF, Power=0.1W, Tolerance=±1%, Author="CERN DEM JLC", Component Type=Standard, CreateDate=12/3/2007, HelpURL=\\cern.ch\dfs\Applications\Altium\Datasheets\R0603_NIC_NRC.pdf, LatestRevisionDate=3/13/2008, Manufacturer Part Number=R0603_33K_1%_0.1W_100PPM, Mounted=Yes, Part Description="General Purpose Thick Film Chip Resistor", Part Number=R0603_33K_1%_0.1W_100PPM, Pin Count=2, PressFit=No, Sense=No, SMD=Yes, Socket=No, Status=Preferred, TC=±100ppm/°C
R19: library part R0603_750K_1%_0.1W_100PPM, "Resistor - 1%", Case=0603, Manufacturer=GENERIC, Manufacturer1 ComponentHeight=0.55mm, Manufacturer1 Example="NIC COMPONENT", Manufacturer1 Part Number=NRC06F7503TRF, Power=0.1W, Tolerance=±1%, Author="CERN DEM JLC", Component Type=Standard, CreateDate=12/3/2007, HelpURL=\\cern.ch\dfs\Applications\Altium\Datasheets\R0603_NIC_NRC.pdf, LatestRevisionDate=3/13/2008, Manufacturer Part Number=R0603_750K_1%_0.1W_100PPM, Mounted=Yes, Part Description="General Purpose Thick Film Chip Resistor", Part Number=R0603_750K_1%_0.1W_100PPM, Pin Count=2, PressFit=No, Sense=No, SMD=Yes, Socket=No, Status=Preferred, TC=±100ppm/°C
R21: library part R0603_78K7_0.1%_0.063W_10PPM, "Resistor - 0.1%", Case=0603, Manufacturer=GENERIC, Manufacturer1 ComponentHeight=0.5mm, Manufacturer1 Example="TYCO HOLSWORTHY", Manufacturer1 Part Number=RN73C1J78K7BTDF, Power=0.063W, Tolerance=±0.1%, Author="CERN DEM JLC", Component Type=Standard, CreateDate=12/3/2007, HelpURL=\\cern.ch\dfs\Applications\Altium\Datasheets\R0603_Tyco_RN73.pdf, LatestRevisionDate=3/13/2008, Manufacturer Part Number=R0603_78K7_0.1%_0.063W_10PPM, Mounted=Yes, Part Description="Thin Film Chip Resistor", Part Number=R0603_78K7_0.1%_0.063W_10PPM, Pin Count=2, PressFit=No, Sense=No, SMD=Yes, Socket=No, Status="Not Recommended", TC=±10ppm
R24 R25: library part R0402_1M_1%_0.0625W_100PPM, "Resistor - 1%", Case=0402, Manufacturer=GENERIC, Manufacturer1 ComponentHeight=0.4mm, Manufacturer1 Example="YAGEO PHYCOMP", Manufacturer1 Part Number=232270671005L, Power=0.0625W, Tolerance=±1%, Author="CERN DEM JLC", Component Type=Standard, CreateDate=12/3/2007, HelpURL=\\cern.ch\dfs\Applications\Altium\Datasheets\R0402_Phycomp_RC0402.pdf, LatestRevisionDate=10/17/2012, Manufacturer Part Number=R0402_1M_1%_0.0625W_100PPM, Mounted=Yes, Part Description="General Purpose Thick Film Chip Resistor", Part Number=R0402_1M_1%_0.0625W_100PPM, Pin Count=2, PressFit=No, Sense=No, SMD=Yes, Socket=No, Status="Not Recommended", TC=±100ppm/°C
SW1: library part STELVIO-KONTEK_3131730000402, "Jumper 1 Pin", Manufacturer=STELVIO-KONTEK, Manufacturer Part Number=3131730000402, Author="CERN DEM JLC", ClassName=Overlapping, Component Type=Standard, ComponentHeight=6.5mm, CreateDate=27/08/2013, Family=Jumper, HelpURL=\\cern.ch\dfs\Applications\Altium\Datasheets\STELVIO-KONTEK_3131730000402.pdf, LatestRevisionDate=27/08/2013, Mounted=Yes, Part Description="Closed Insulated Red Jumper Pitch 2.54mm", Part Number=STELVIO-KONTEK_3131730000402, Pin Count=1, PressFit=No, SCEM=09.55.10.950.1, Sense=No, SMD=No, Socket=No, Status=None
T1 T2 T3: "N-CHANNEL MOSFET WITH DIODE", Case=SOT23-3, Manufacturer=NEXPERIA, Author="CERN DEM JLC", Bonding=No, Component Type=Standard, ComponentHeight=1.1mm, CreateDate=16/03/2010, Device=BSH103, HelpURL=\\cern.ch\dfs\Applications\Altium\Datasheets\BSH103.pdf, LatestRevisionDate=20/06/2017, Manufacturer Part Number=BSH103, Mounted=Yes, PackageDescription="SOT23, 0.95mm Pitch; 3 Pin, 1.30mm W X 2.90mm L X 1.10mm H body, IPC Medium Density", Part Description="30V, 850mA N-Channel Enhancement Mode Field-Effect Transistor", Part Number=BSH103, Pin Count=3, PressFit=No, Sense=No, SMD=Yes, Socket=No
TA1 TA2 TA3 TA4 TA5 TA6 TA7 TA8: library part lane_width_transition
U1: "No Description Available", Mfr_Name="Analog Devices Inc", RefDes=RefDes, Type=Type
W1 W2 W3: library part SAMTEC_HTSW-103-23-L-S, "3 Mini Wire-Wrap Contact Strip Header", Manufacturer=SAMTEC, Manufacturer Part Number=HTSW-103-23-L-S, Author="CERN DEM JLC", Component Type=Standard, ComponentHeight=8.38mm, Family="Header 3", HelpURL=\\cern.ch\dfs\Applications\Altium\Datasheets\SAMTEC_HTSW-103-23-L-S.pdf, Mounted=Yes, Part Number=SAMTEC_HTSW-103-23-L-S, Pin Count=3, PressFit=No, Sense=No, SMD=No, Socket=No, Status=Preferred, Status Comment="High Temperature"
  W1 W2: CreateDate=2/22/2018, LatestRevisionDate=2/22/2018, Part Description="3 Contacts, Pitch 2.54mm, Single Row Through Mount Straight Header (Post Lead 5.84mm, Tail Lead 2.92mm, Insulator 2.54mm)"
  W3: CreateDate=22/02/2018, LatestRevisionDate=22/02/2018, Part Description="3 Contacts, Pitch 2.54mm, Single Row  Through Mount Straight Header (Post Lead 5.84mm, Tail Lead 2.92mm, Insulator 2.54mm)"
W4 W5 W6: library part SAMTEC_HTSW-102-23-L-S, "2 Mini Wire-Wrap Contact Strip Header", Manufacturer=SAMTEC, Manufacturer Part Number=HTSW-102-23-L-S, Author="CERN DEM JLC", Component Type=Standard, ComponentHeight=8.38mm, CreateDate=2/22/2018, Family="Header 2", HelpURL=\\cern.ch\dfs\Applications\Altium\Datasheets\SAMTEC_HTSW-102-23-L-S.pdf, LatestRevisionDate=2/22/2018, Mounted=Yes, Part Description="2 Contacts, Pitch 2.54mm, Single Row  Through Mount Straight Header (Post Lead 5.84mm, Tail Lead 2.92mm, Insulator 2.54mm)", Part Number=SAMTEC_HTSW-102-23-L-S, Pin Count=2, PressFit=No, Sense=No, SMD=No, Socket=No, Status=Preferred, Status Comment="High Temperature"
W7: library part SAMTEC_HTSW-104-23-L-S, "4 Mini Wire-Wrap Contact Strip Header", Manufacturer=SAMTEC, Manufacturer Part Number=HTSW-104-23-L-S, Author="CERN DEM JLC", Component Type=Standard, ComponentHeight=8.38mm, CreateDate=2/22/2018, Family="Header 4", HelpURL=\\cern.ch\dfs\Applications\Altium\Datasheets\SAMTEC_HTSW-104-23-L-S.pdf, LatestRevisionDate=2/22/2018, Mounted=Yes, Part Description="4 Contacts, Pitch 2.54mm, Single Row  Through Mount Straight Header (Post Lead 5.84mm, Tail Lead 2.92mm, Insulator 2.54mm)", Part Number=SAMTEC_HTSW-104-23-L-S, Pin Count=4, PressFit=No, Sense=No, SMD=No, Socket=No, Status=Preferred, Status Comment="High Temperature"

## Free pads (board coordinates)
  round 196.85 hole 125.98: Frame_Holes(196.85,196.85) Frame_Holes(196.85,3740.16) Frame_Holes(3740.16,196.85) Frame_Holes(3740.16,3740.16)

## Via types
v1: diameter 19.68, hole 9.84, Top Layer to Bottom Layer, tented both sides, 742 vias
v2: diameter 23.62, hole 11.81, Top Layer to Bottom Layer, tented both sides, 597 vias
v3: diameter 19.68, hole 9.84, Top Layer to Bottom Layer, 9 vias

## Nets (pads, with @x,y where several pads share a name; then routed paths per layer and width w, separated by ;. In a path a pad name is that pad's centre, name@x,y a point inside that pad or via, vN(x,y) a via of type N, cw(c..) or ccw(c..) an arc to the next point about the centre after c; other vN are vias at no path point)
CLK_IN_N: R18.2 R25.2 TA8.D U1.11 | length 1312.8
  Top Layer w4: TA8.D@1935.25,562.22 1935.25,1728.91 1935.25,1773.39 1935.25,1857.66 ccw(c1926.24,1866.66) 1938.98,1866.66 U1.11@1938.98,1874
CLK_IN_P: R18.1 R24.1 TA7.D U1.10 | length 1312.8
  Top Layer w4: U1.10@1919.29,1874 1919.29,1866.66 ccw(c1932.02,1866.66) 1923.02,1857.66 1923.02,1728.94 TA7.D@1923.02,562.22
CLK_OUT_N: R4.1 TA4.D U1.25 | length 1312.8
  Top Layer w4: TA4.D@2033.67,3374.79 2033.67,2326.48 2033.67,2221.28 2033.67,2079.35 cw(c2024.67,2070.34) 2037.4,2070.34 U1.25@2037.4,2063
CLK_OUT_P: R3.1 TA3.D U1.26 | length 1312.8
  Top Layer w4: U1.26@2017.72,2063 2017.72,2070.34 cw(c2030.45,2070.34) 2021.45,2079.35 2021.45,2090.47 2021.45,2221.39 TA3.D@2021.45,3374.79
DATA_IN_N: TA5.D U1.4 | length 1312.8
  Top Layer w4: TA5.D@562.22,1974.62 1857.66,1974.62 cw(c1866.66,1965.61) 1866.66,1978.35 U1.4@1874,1978.35
DATA_IN_P: TA6.D U1.5 | length 1312.8
  Top Layer w4: TA6.D@562.22,1962.39 1857.66,1962.39 ccw(c1866.66,1971.39) 1866.66,1958.66 U1.5@1874,1958.66
DATA_OUT_N: R2.1 TA2.D U1.28 | length 1307.9
  Top Layer w4: TA2.D@1169.19,2987.71 1494.32,2662.58 1498.27,2658.64 1522.01,2634.9 cw(c1501.34,2614.23) 1522.04,2634.86 1523.8,2633.11 1523.8,2632.94 cw(c1501.34,2614.23) 1522.01,2593.57 ccw(c1534.02,2581.54) 1522,2569.52 ccw(c1534.02,2581.54) 1546.04,2569.52 cw(c1566.71,2548.86) 1585.42,2571.31 1585.59,2571.31 1587.34,2569.56 cw(c1566.71,2548.86) 1587.38,2569.52 1589.17,2567.73 1593.12,2563.79 1923.93,2232.97 1945.08,2211.83 1945.15,2211.75 cw(c1874.02,2140.62) 1974.62,2140.62 1974.62,2079.35 cw(c1965.61,2070.34) 1978.35,2070.34 U1.28@1978.35,2063
DATA_OUT_P: R1.1 TA1.D U1.29 | length 1307.3
  Top Layer w4: TA1.D@1160.55,2979.07 1485.68,2653.94 1489.62,2649.99 1513.33,2626.29 cw(c1501.34,2614.23) 1513.36,2602.21 ccw(c1534.02,2581.54) 1513.36,2560.87 ccw(c1534.02,2581.54) 1554.63,2560.82 1554.69,2560.88 cw(c1566.71,2548.86) 1578.76,2560.86 1580.53,2559.09 1584.47,2555.14 1936.43,2203.18 cw(c1873.76,2140.51) 1962.39,2140.51 ; U1.29@1958.66,2063 1958.66,2070.34 cw(c1971.39,2070.34) 1962.39,2079.35 1962.39,2086.64 ccw(c1958.39,2086.64) 1958.39,2090.64 1958.17,2090.64 cw(c1958.17,2094.14) 1958.17,2097.64 1958.39,2097.64 ccw(c1958.39,2101.64) 1962.39,2101.64 1962.39,2110.64 1962.39,2140.62